# Altium PCB Portable-Charger-v1.0.PcbDoc (part 2 of 3)
Units mil, origin at the board's own origin, x right, y up, seen from the top; angles counter-clockwise.
Board outline 2795.35 x 6293 mil, 2 copper layers (Top Layer, Bottom Layer), stack 57 mil thick; 75 components, 50 nets, 273 pads, 200 vias.
Unrouted connection lines stored in the file: 2.
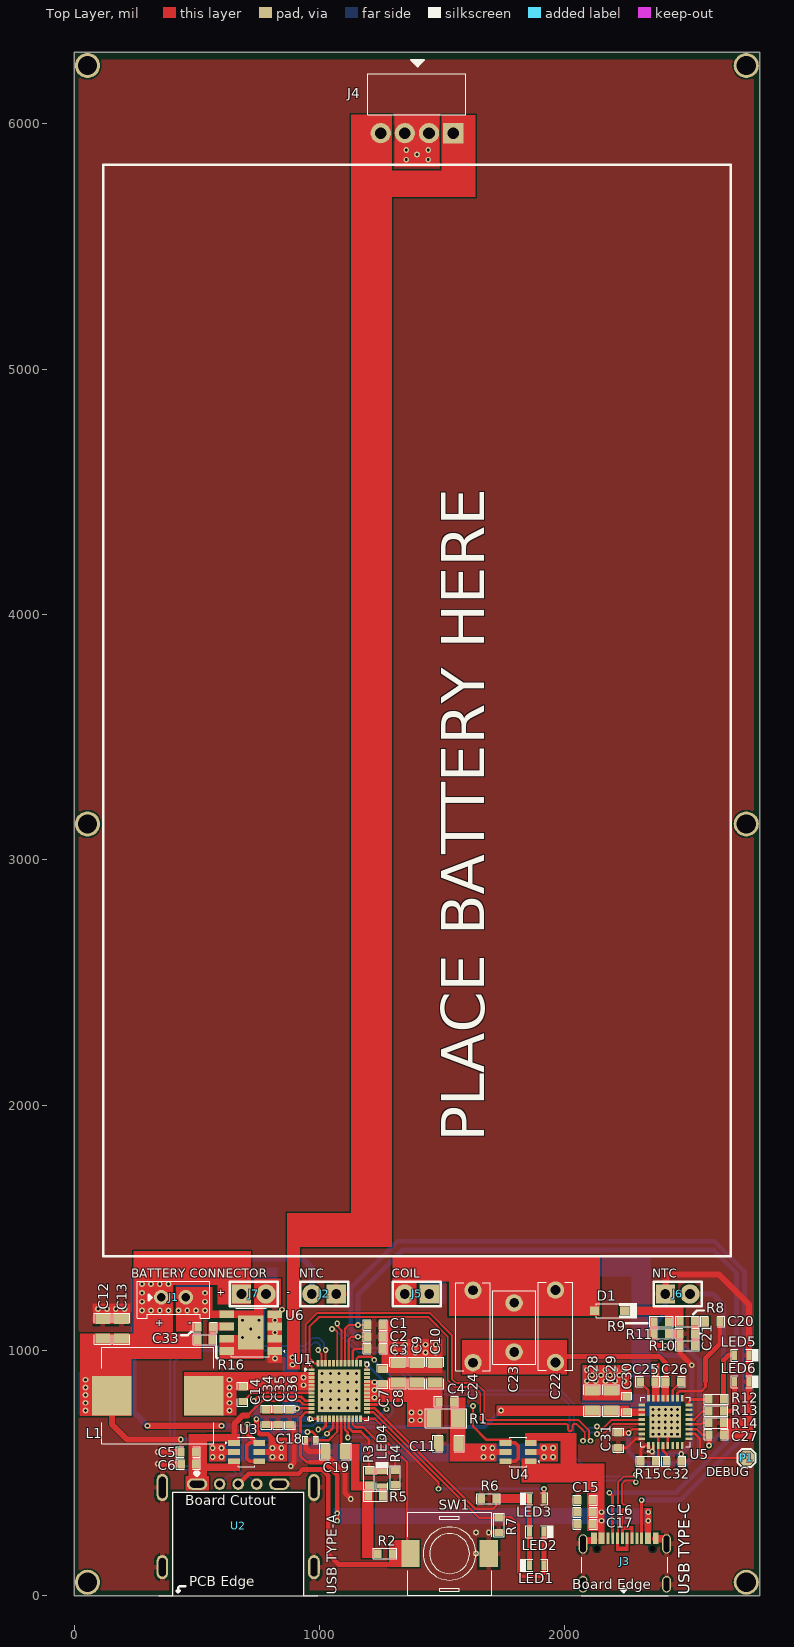
[diagram p0: Top Layer view]

## Part data (continued)
R10: library part RT0603BRD0733KL, "RES SMD 33K OHM 0.1% 1/10W 0603", Case Code (Imperial)=0603, Case Code (Metric)=1608, LCSC Part Number=C705768, Manufacturer=Yageo, Max Operating Temperature=125°C, Max Power Dissipation=100mW, Min Operating Temperature=-55°C, Package Quantity=5000, Resistance=33kR, Resistor Type="Thin Film", Temperature Coefficient=25ppm/°C, Voltage Rating=75V, Voltage Rating (DC)=50V, Case/Package=0603, Category="Chip SMD Resistors", ComponentLink1Description=https://datasheet.ciiva.com/2585/pyu-rt-1-to-0-05-rohs-l-4-2585891.pdf?src-supplier=Digi-Key, ComponentLink1URL=https://datasheet.ciiva.com/2585/pyu-rt-1-to-0-05-rohs-l-4-2585891.pdf?src-supplier=Digi-Key, ComponentLink2Description=https://datasheet.ciiva.com/12810/pyu-rt-1-to-0-05-rohs-l-4-12810117.pdf?src-supplier=Mouser, ComponentLink2URL=https://datasheet.ciiva.com/12810/pyu-rt-1-to-0-05-rohs-l-4-12810117.pdf?src-supplier=Mouser, ComponentLink3Description=https://datasheet.ciiva.com/8889/pyu-rt-1-to-0-05-rohs-l-4-8889590.pdf?src-supplier=Avnet, ComponentLink3URL=https://datasheet.ciiva.com/8889/pyu-rt-1-to-0-05-rohs-l-4-8889590.pdf?src-supplier=Avnet, Construction=Rectangular, Contact Plating=Tin,Matte, Depth=0.8mm, Features="Moisture Resistant", Height=0.022inch, Lead Free="Lead Free", Length=1.6mm, Manufacturer Part Number=RT0603BRD0733KL, Military Standard=Not, Number of Terminations=2, Packaging="Tape and Reel", Power Rating=100mW, Pricing 1="1=0.30860 (USD)", Radiation Hardening=No, RoHS=Yes, RoHS Compliant=Yes, Series=RT, Size Code=0603, Stock 1=2, Supplier 1="Arrow Electronics", Supplier Part Number 1=RT0603BRD0733KL, Termination=SMD/SMT, Weight=7.1E-05oz, Width=0.031inch
R15: library part PE0603FRF570R02L, "RES 0.02 OHM 1% 1/2W 0603", Case/Package=0603, LCSC Part Number=C1730619, Manufacturer=Yageo, Max Operating Temperature=170°C, Max Power Dissipation=500mW, Min Operating Temperature=-55°C, Package Quantity=5000, Supplier Part Number 1=PE0603FRF570R02L-ND, Temperature Coefficient=100ppm/°C, Tolerance=1%, Category="Chip SMD Resistors", ComponentLink1Description=http://www.mouser.com/ds/2/447/PYu-PE_521_RoHS_L_5-1077989.pdf?src-supplier=Mouser, ComponentLink1URL=http://www.mouser.com/ds/2/447/PYu-PE_521_RoHS_L_5-1077989.pdf?src-supplier=Mouser, ComponentLink2Description=http://www.yageo.com/documents/recent/PYu-PE_521_RoHS_L_5.pdf?src-supplier=Digi-Key, ComponentLink2URL=http://www.yageo.com/documents/recent/PYu-PE_521_RoHS_L_5.pdf?src-supplier=Digi-Key, Features="Moisture Resistant,Automotive AEC-Q200", Height=0.024inch, Item Type=Resistor, Length=0.063inch, Manufacturer Part Number=PE0603FRF570R02L, Number of Terminations=2, Packaging="Tape and Reel", Pricing 1="5000=0.35747 (USD)", RoHS=Yes, Series=PE, Supplier 1=Digi-Key, Width=0.03inch
R16: library part RC0603JR-071KL, "RES SMD 1K 0.1W 0603  75 V, Thick Film", Case Code (Imperial)=0603, Case Code (Metric)=1608, LCSC Part Number=C14676, Manufacturer=Yageo, Max Operating Temperature=155°C, Min Operating Temperature=-55°C, Package Quantity=5000, Power Rating=100mW, Resistance=1kR, Resistance Tolerance=5%, Resistor Type="Thick Film", Supplier Part Number 1=311-1.0KGRCT-ND, Temperature Coefficient=100ppm/°C, Voltage Rating=50V, Body Length=1.6mm, Case/Package=0603, Category="Chip SMD Resistors", Construction=Rectangular, Contact Plating=Tin,Matte, Depth=0.8mm, Height=0.45mm, Item Type=Resistor, Lead Free="Lead Free", Length=1.6mm, Manufacturer Part Number=RC0603JR-071KL, Military Standard=Not, Number of Pins=2, Packaging="Tape and Reel", Pricing 1="1=0.10000, 10=0.02000, 100=0.00800, 1000=0.00360, 2500=0.00312 (USD)", Radiation Hardening=No, REACH SVHC=Unknown, RoHS=Yes, RoHS Compliant=Yes, Series=RC, Size Code=0603, Stock 1=1727570, Supplier 1=Digi-Key, Termination=SMD/SMT, Tolerance=5%, Voltage Rating (DC)=50V, Width=0.8mm
SW1: "Tactile Switches SMT Top Push 0.9mm 7N Trav 100m Yellow", LCSC Part Number=C341731, Manufacturer="Alps Electric", Supplier Part Number 1=688-SKSTACE010, Category="Tactile Switches", Manufacturer Part Number=SKSTACE010, Pricing 1="1=1.08000, 10=1.08000, 50=0.90100, 100=0.81900, 1000=0.76700, 10000=0.74100 (USD)", RoHS=Yes, RoHS Compliant=Yes, Stock 1=1089, Supplier 1=Mouser
U1: "PMIC 22.5W Power Bank", Manufacturer="ZHUHAI ISMARTWARE TECHNOLOGYCO., LTD.", Package="QFN-48 (6x6)", Manufacturer Part Number=SW6208
U2: "USB 2.0 5A 1 235℃ Sink board 4 Female -25℃~+85℃ Gold Copper Alloy Type-A Plugin USB Connectors ROHS", LCSC Part Number=C2689740, Manufacturer="XKB Connectivity", Package=Plugin, ComponentLink1Description=LCSC, ComponentLink1URL=https://www.lcsc.com/product-detail/USB-Connectors_XKB-Connectivity-U224-051N-3GRA035_C2689740.html, Item Type="USB Connector", Manufacturer Part Number=U224-051N-3GRA035
U3 U4: "20V 6A 22mΩ@4.5V,4.5A 2W 2PCSNChannel(Common Drain) SOT-23-6 MOSFETs ROHS", LCSC Part Number=C841290, Manufacturer="Shenzhen Fuman Elec", Package=SOT-23-6, ComponentLink1Description=LCSC, ComponentLink1URL=https://www.lcsc.com/product-detail/MOSFETs_Shenzhen-Fuman-Elec-8205A_C841290.html, Item Type=IC, Manufacturer Part Number=.8205A
U5: "QFN-32-EP(5x5) Wireless Charge-Discharge ICs ROHS", LCSC Part Number=C2921390, Manufacturer=INJOINIC, Package=QFN-32-EP(5x5), ComponentLink1Description=LCSC, ComponentLink1URL=https://www.lcsc.com/product-detail/Wireless-Charge-Discharge-ICs_INJOINIC-IP6826_C2921390.html, Item Type=IC, Manufacturer Part Number=IP6826
U6: "One Cell Lithium-ion/Polymer Battery Protection IC", Manufacturer=Xysemi, Package="SOP 8-EPAD", Manufacturer Part Number=XB8889A

## Free pads (board coordinates)
  round 102.36 hole 78.74 mask+1.97: MH(55.12,6237.88) MH(55.12,55.12) MH(55.12,3146.46) MH(2740.24,6237.88) MH(2740.24,55.12) MH(2740.24,3146.46)

## Via types
v1: diameter 23.62, hole 11.81, Top Layer to Bottom Layer, 200 vias

## Nets (pads, with @x,y where several pads share a name; then routed paths per layer and width w, separated by ;. In a path a pad name is that pad's centre, name@x,y a point inside that pad or via, vN(x,y) a via of type N, cw(c..) or ccw(c..) an arc to the next point about the centre after c; other vN are vias at no path point)
BSET: LED4.2 R3.2 U1.21 | length 264.9
  Top Layer w11: U1.21@1120.18,721.69 1120.18,684.4 1134.94,669.65 1168.35,669.65 1202.58,635.42 R3.2@1202.57,510.47
BST: C14.2 U1.7 | length 295.1
  Top Layer w10: C14.2@687,792 689.5,792 724.5,827 U1.7@967.62,827
CC1: C1.1 J3.A5 U1.41 | length 3481.1
  Top Layer w10: U1.41@1104.43,948.06 1104.43,1088.04 1119.69,1103.3 1120.39,1104 v1(1157.58,1104) 1196.87,1104 C1.1@1197,1103.87
  Top Layer w12: v1(2181.99,420) 2195.77,406.22 J3.A5@2195.77,234.01
  Bottom Layer w20: v1(1157.58,1104) 1157.58,1227.58 1339.77,1409.77 2607.23,1409.77 2700,1317 2700,666.96 2453.04,420 v1(2181.99,420)
CC2: C2.1 J3.B5 U1.40 | length 3479.1
  Top Layer w10: U1.40@1120.18,948.06 1120.18,1046.03 1130.15,1056 C2.1@1197,1056
  Top Layer w12: J3.B5@2313.88,234.01 v1(2313.88,389.85)
  Bottom Layer w20: v1(1157.58,1056) 1157.58,1056.11 1128.07,1085.62 1128.07,1254.63 1318.92,1445.48 2610.41,1445.48 2732.55,1323.35 2732.55,650.76 2471.64,389.85 v1(2313.88,389.85)
DA1_N: U1.46 U2.2 | length 1540.1
  Top Layer w8: U1.46@1025.69,948.06 v1(1025.69,1001.84)
  Bottom Layer w8: U2.2@593.4,455.29 628.03,489.91 655.81,489.91 660.49,494.6 660.49,501.23 649.31,512.41 442.52,512.41 400.18,554.75 391.5,563.43 391.5,955.53 391.5,961.5 447.84,1017.84 939.5,1017.84 971.88,1050.21 998.69,1050.21 1018.88,1030.02 1018.88,1012.88 1025.69,1006.07 v1(1025.69,1001.84)
DA1_P: U1.47 U2.4 | length 1540.6
  Top Layer w8: v1(995.07,1001.84) 995.07,997.61 1008.69,983.99 1008.69,949.31 U1.47@1009.94,948.06
  Bottom Layer w8: U2.4@744.58,455.29 709.96,489.91 682.18,489.91 677.49,494.6 677.49,508.27 656.35,529.41 576.7,529.41 518.7,529.41 cw(c518.7,538.41) 509.7,538.41 509.7,553.46 ccw(c500.7,553.46) 491.7,553.46 491.7,538.41 cw(c482.7,538.41) 482.7,529.41 469.1,529.41 449.56,529.41 424.22,554.75 408.5,570.48 408.5,722.75 408.5,954.46 409.58,955.53 454.88,1000.84 946.54,1000.84 978.92,1033.21 991.65,1033.21 1001.88,1022.98 1001.88,1012.88 995.07,1006.07 v1(995.07,1001.84)
DA2_N: U1.48 U5.28 | length 2048.8
  Top Layer w8: U1.48@994.2,948.06 992.86,946.73 980.98,946.73 960.09,967.62 960.09,1097.9 998.69,1136.5 1442.95,1136.5 1523.29,1056.16 1523.29,878.16 1551.08,850.37 1631.36,850.37 1655.84,825.89 1655.84,720.14 1675.98,700 1773.65,700 1983,700 2005,700 cw(c2005,691) 2014,691 2014,680.15 ccw(c2023,680.15) 2032,680.15 2032,691 cw(c2041,691) 2041,700 2049,700 2070.62,678.38 2081.81,667.19 2081.81,638.61 v1(2075,631.8) ; v1(2131.25,690.29) 2135.48,690.29 2142.29,683.48 2157.64,683.48 2191.66,717.5 2312.63,717.5 U5.28@2313.97,718.84
  Bottom Layer w8: v1(2075,631.8) 2075,636.03 2081.81,642.84 2081.81,665.58 2099.72,683.48 2124.21,683.48 2131.02,690.29 v1(2131.25,690.29)
DA2_P: U1.1 U5.29 | length 2048.8
  Top Layer w8: U1.1@967.62,921.49 968.96,922.82 968.96,934.71 943.09,960.58 943.09,1104.94 991.65,1153.5 1449.99,1153.5 1540.29,1063.2 1540.29,885.2 1558.12,867.37 1638.4,867.37 1672.84,832.93 1672.84,727.18 1683.02,717 2056.04,717 2098.81,674.23 2098.81,638.61 v1(2105.62,631.8) ; v1(2131.25,659.67) 2135.48,659.67 2142.29,666.48 2164.69,666.48 2198.7,700.5 2312.63,700.5 U5.29@2313.97,699.16
  Bottom Layer w8: v1(2105.62,631.8) 2105.62,636.03 2098.81,642.84 2098.81,658.53 2106.76,666.48 2124.21,666.48 2131.02,659.67 v1(2131.25,659.67)
DC_N: J3.A7 J3.B7 U1.42 | length 2090.9
  Top Layer w8: v1@1074.43,1108.2 1074.43,1098.57 1089.94,1083.06 1089.94,949.31 U1.42@1088.68,948.06 ; J3.B7@2215.45,234.01 2216.79,235.35 2216.79,463.17 2240.64,487.02 2278.96,487.02 2285.77,493.83 v1(2290,493.83)
  Bottom Layer w8: v1(1072.94,1109.69) 1075.93,1106.71 1075.93,1097.07 1163.58,1009.42 1257.58,1009.42 1430,837 1983,837 2037,783 2037,570 2119.98,487.02 2283.19,487.02 v1(2290,493.83)
DC_P: J3.A6 J3.B6 U1.43 | length 2090.9
  Top Layer w8: v1(1051.28,1088.04) 1060.92,1088.04 1072.94,1076.02 U1.43@1072.94,948.06 ; J3.A6@2235.14,234.01 2233.79,235.35 2233.79,323.36 2233.79,345.36 cw(c2242.79,345.36) 2242.79,354.36 2245.8,354.36 ccw(c2245.8,363.36) 2245.8,372.36 2242.79,372.36 cw(c2242.79,381.36) 2233.79,381.36 2233.79,420 2233.79,456.13 2247.68,470.02 2278.96,470.02 2285.77,463.2 v1(2290,463.2)
  Bottom Layer w8: v1(1051.28,1088.04) 1054.27,1085.05 1063.9,1085.05 1156.53,992.42 1250.54,992.42 1422.96,820 1975.96,820 2020,775.96 2020,562.96 2112.94,470.02 2283.19,470.02 v1(2290,463.2)
DEBUG: P1.1 U5.10 | length 314.5
  Top Layer w10: U5.10@2506.89,659.79 2531.57,659.79 2550.1,641.26 2550.1,579.97 2568.08,562 P1.1@2745,562
FOD_THR: R14.2 U5.12 | length 83
  Top Layer w10: U5.12@2506.89,699.16 2556.84,699.16 2562.69,705.01 R14.2@2587.43,705
GATEA1: U1.36 U3.4 U3.6 | length 1131.1
  Top Layer w10: U1.36@1194,921.49 v1(1194,943.1)
  Top Layer w15: U3.6@740.95,623.29 715.6,623.29 703.4,611.09 703.4,560.69 715.6,548.49 U3.4@754.97,548.49
  Top Layer w20: v1(706.51,699.45) 706.51,659.94 740.95,625.5 743.16,623.29 U3.6@754.97,623.29
  Bottom Layer w10: v1(706.51,699.45) 710.2,699.45 715.9,693.74 974.79,693.74 986.43,705.39 1259.1,705.39 1297.99,744.27 1297.99,839.11 v1(1194,943.1)
GATEC: U1.38 U4.4 U4.6 | length 980.8
  Top Layer w10: U1.38@1151.68,948.06 1152.39,948.78 1152.39,967.26 1160.44,975.32 1210.55,975.32 v1(1223.88,961.98) ; v1(1626.28,773.73) 1626.28,690.98 1681.77,635.5 1745.03,635.5 ; U4.4@1747.04,623.29 U4.4@1758.85,623.29
  Top Layer w15: U4.6@1758.85,548.49 1799.22,548.49 1810.42,559.69 1810.42,611.09 1798.22,623.29 U4.4@1758.85,623.29
  Bottom Layer w10: v1(1223.88,961.98) 1412.13,773.73 v1(1626.28,773.73)